# Altium PCB Lamps_motherboard.PcbDoc
Units mm, origin at the board's own origin, x right, y up, seen from the top; angles counter-clockwise.
Board outline 106 x 41 mm, 2 copper layers (Top Layer, Bottom Layer), stack 1.671 mm thick; 21 components, 30 nets, 130 pads, 12 vias.
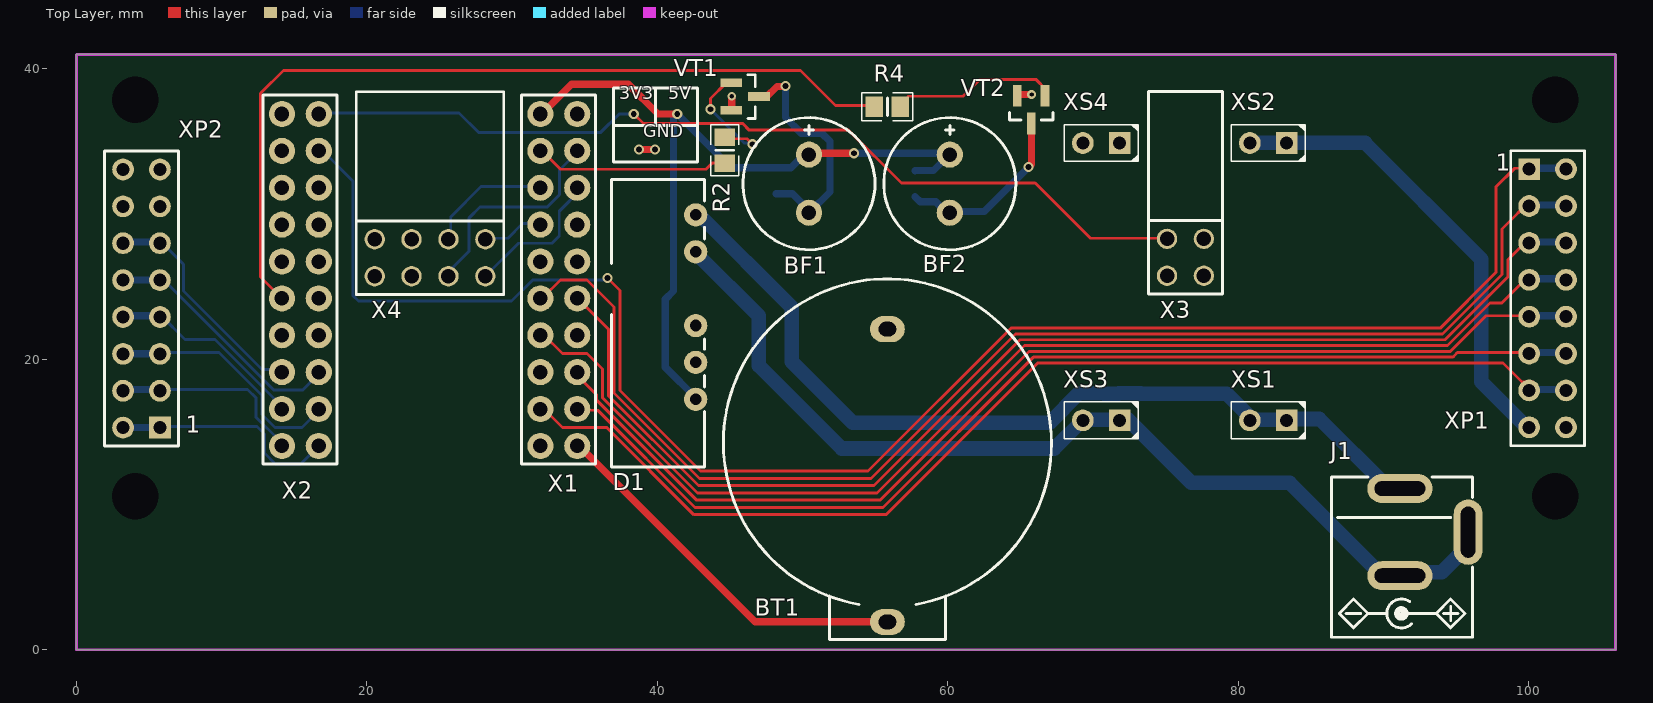
[diagram p0: Top Layer view]
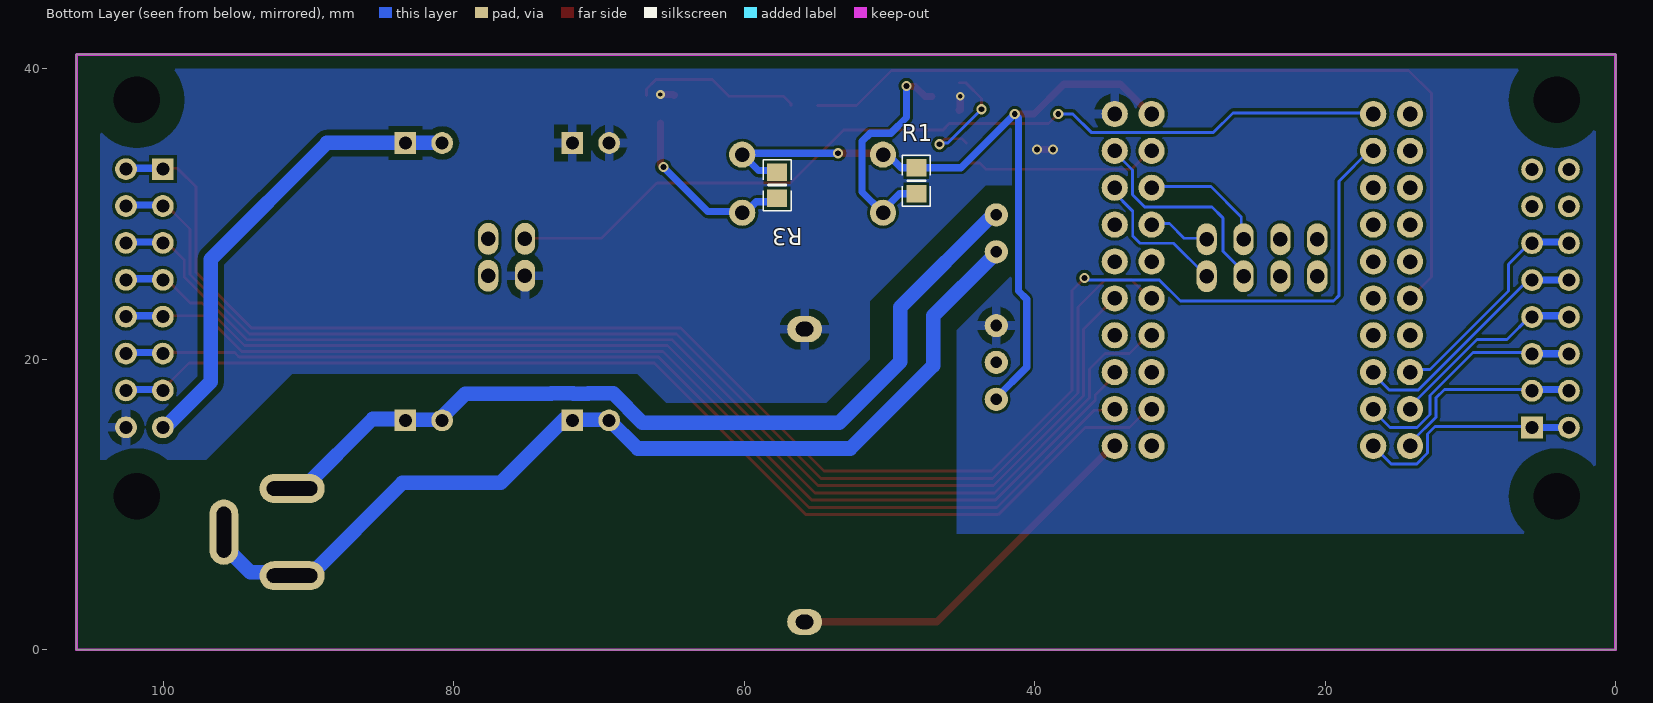
[diagram p1: Bottom Layer view, seen from below]
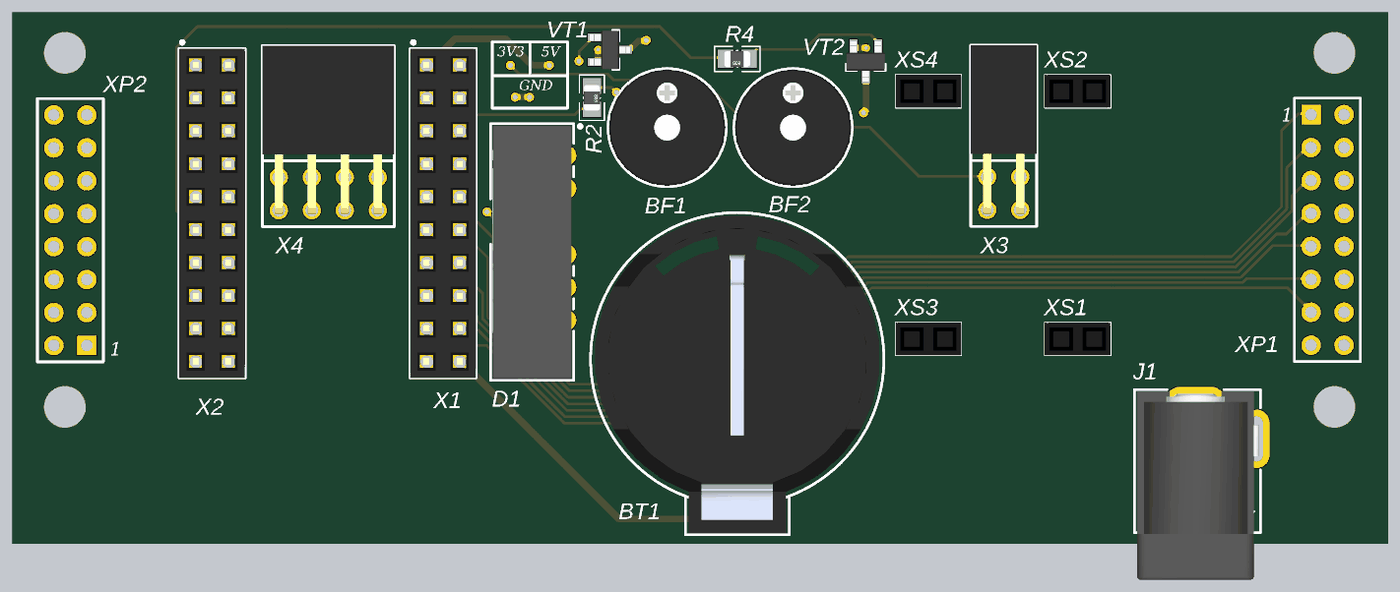
[diagram p2: 3D render of the assembled board from above, using the file's embedded part models]

## Layer stack, top to bottom
Top Solder: solder mask 0.0102, Solder Resist, Dk 3.5
Top Layer: signal copper 0.0356
Dielectric 1: dielectric 1.6, FR-4, Dk 4.8
Bottom Layer: signal copper 0.0356
Bottom Solder: solder mask 0.0102, Solder Resist, Dk 3.5

## Board outline
0,0 106,0 106,41 0,41

## Design rules (kind name [scope] priority, off if disabled: settings)
BoardOutlineClearance [All] p1: gap=0.2 ignorepadtopadclearanceinfootprint=FALSE
Clearance Holes [OnLayer('Keep-Out Layer')] p1: gap=0.5 ignorepadtopadclearanceinfootprint=FALSE
Clearance Pads [InPadClass('FreePads')] p2: gap=1.702 ignorepadtopadclearanceinfootprint=FALSE
Clearance Power [InNet('+V')] p3: gap=0.4 ignorepadtopadclearanceinfootprint=FALSE
Clearance [All] p4: gap=0.2 ignorepadtopadclearanceinfootprint=FALSE
ComponentClearance [All] p1: gap=0.127 collisioncheckmode=3 verticalgap=0.127 showdistances=TRUE
DiffPairsRouting [All] p1: maxlimit=0.254 minlimit=0.127 mostfreqgap=0.127 toplayer_minwidth=0.127 toplayer_maxwidth=25.4 toplayer_prefwidth=0.127 bottomlayer_minwidth=0.127 bottomlayer_maxwidth=25.4 bottomlayer_prefwidth=0.127 maxuncoupledlength=12.7
Height [All] p1: minheight=0 maxheight=1816.048 prefheight=12.7
HoleSize [All] p1: absolutevalues=TRUE maxlimit=6.3 minlimit=0.3 maxpercent=80.000 minpercent=20.000
HoleToHoleClearance [All] p1: gap=0.25 allowstackedmicrovias=FALSE
MinimumAnnularRing [All] p1: minimumring=0.076
MinimumSolderMaskSliver [All] p1: minsoldermaskwidth=0
PlaneClearance [All] p1: clearance=0.127
PlaneConnect PlaneConnectPowerPads [InPadClass('PowerPads')] p1: planeconnectstyle=Direct reliefexpansion=0.508 reliefentries=4 reliefconductorwidth=0.254 reliefairgap=0.254
PlaneConnect [All] p2: pad.planeconnectstyle=Relief pad.reliefexpansion=0.3 pad.reliefentries=4 pad.reliefconductorwidth=0.127 pad.reliefairgap=0.127 via.planeconnectstyle=Direct via.reliefexpansion=0.3 via.reliefentries=4 via.reliefconductorwidth=0.127 via.reliefairgap=0.127
PolygonConnect PolygonConnectPowerPads [All vs (InPadClass('PowerPads'))] p1: connectstyle=Direct reliefconductorwidth=0.254 reliefentries=4 polygonreliefangle="90 Angle" airgapwidth=0.254
PolygonConnect [All] p2: thpad.connectstyle=Relief thpad.reliefconductorwidth=0.635 thpad.reliefentries=4 thpad.polygonreliefangle="90 Angle" thpad.airgapwidth=0.508 smdpad.connectstyle=Relief smdpad.reliefconductorwidth=0.127 smdpad.reliefentries=4 smdpad.polygonreliefangle="90 Angle" smdpad.airgapwidth=0.127 via.connectstyle=Direct via.reliefconductorwidth=0.127 via.reliefentries=4 via.polygonreliefangle="90 Angle" via.airgapwidth=0.127
RoutingVias [All] p1: holewidth=0.3 width=0.6 viastyle="Through Hole" minholewidth=0.3 minwidth=0.6 maxholewidth=0.6 maxwidth=6.6
SilkToSilkClearance [All] p1: silktosilkclearance=0
SilkToSolderMaskClearance [IsPad] p1: minsilkscreentomaskgap=0.127 clearancetoexposedcopper=TRUE
SolderMaskExpansion [All] p1: expansion=0.075
Width [All] p1: maxlimit=25.4 minlimit=0.2 preferedwidth=0.5 minimp=50.000000 maximp=50.000000 favimp=50.000000
20 further rules are at their usual default settings.

## Classes and differential pairs
pad class FreePads: Free-5

## Components (designator, comment, footprint, x,y, rotation, side; value= is the part's Value field where it differs from the comment)
BF1 "DIP switch, 2.73 kHz, 3VDC, 80mA, -20...+70°C" "BUZ: AT-0927-TT-6-R" 50.45,32.1 r90 top
BF2 "DIP switch, 2.73 kHz, 3VDC, 80mA, -20...+70°C" "BUZ: AT-0927-TT-6-R" 60.15,32.1 r90 top
BT1 "VBAT" BTH2032 55.85,14.3 r90 top value=BAT3volt
D1 "DC/DC converter, isolator, 12V 167mA, -40...+105°C, SIP-7" "MOD: SIP-7 (B1212S-2W)" 42.65,23.6 r270 top
J1 "DC_POWER_JACK" JAC_PWR2MM 91.15,11.1 r180 top
R1 "1k" RESC2012(0805)N 48.15,32.3 r270 bottom
R2 "1k" RESC2012(0805)N 44.65,34.4 r270 top
R3 "1k" RESC2012(0805)N 57.75,32 r270 bottom
R4 "1k" RESC2012(0805)N 55.85,37.4 r180 top
VT1 "BC846" SOT23-3N 46.05,38.1 r0 top
VT2 "BC846" SOT23-3N 65.75,37.2 r270 top
X1 "Connector, 20pin, 2.54mm, 500VAC, 3A" "CON: PBD-20" 31.95,36.9 r270 top
X2 "Connector, 20pin, 2.54mm, 500VAC, 3A" "CON: PBD-20" 14.15,36.9 r270 top
X3 "Connector, 4pin, 2.54mm, 500VAC, 3A" HDRR_F_2X2 77.65,28.3 r180 top
X4 "Connector, 8pin, 2.54mm, 500VAC, 3A" HDRR_F_2X4 24.35,27 r180 top
XP1 "PBD-16" HDR2X8 100.05,33.1 r270 top
XP2 "PBD-16" HDR2X8 5.75,15.3 r90 top
XS1 "PBS-2" PBS-2-3D 83.35,15.8 r180 top
XS2 "PBS-2" PBS-2-3D 83.35,34.9 r180 top
XS3 "PBS-2" PBS-2-3D 71.85,15.8 r180 top
XS4 "PBS-2" PBS-2-3D 71.85,34.9 r180 top

## Footprints (in the part's own frame and the unit in brackets; to place one, negate y for a bottom-side part, rotate by r counter-clockwise, add the part's x,y. Pads: shape width x height; smd on the part's side, far side on the other; paste and mask are expansions set on the pad)
BTH2032 [mm] "CR2032 BATTERY HOLDER"
  oval 1.8x2.4 hole 1 slot 1.2 at 90 deg: 1(-12.38,0) 2(7.78,0)
  silkscreen extent -13.6,-11.3 11.25,11.3, body extent -13.45,-11 11.05,11, height 8.5
"BUZ: AT-0927-TT-6-R" [mm]
  round 1.8 hole 1: 1(2,0) 2(-2,0)
  silkscreen extent -4.55,-4.55 4.55,4.55, body extent -4.5,-4.5 4.5,4.5, height 4.52
"CON: PBD-20" [mm]
  round 1.8 hole 1: 1(0,0) 2(0,2.54) 3(2.54,0) 4(2.54,2.54) 5(5.08,0) 6(5.08,2.54) 7(7.62,0) 8(7.62,2.54) 9(10.16,0) 10(10.16,2.54) 11(12.7,0) 12(12.7,2.54) 13(15.24,0) 14(15.24,2.54) 15(17.78,0) 16(17.78,2.54) 17(20.32,0) 18(20.32,2.54) 19(22.86,0) 20(22.86,2.54)
  round 0.5 on Top Overlay: ""(-1.775,-1.05)
  round 0.5 on Mech1: ""(-0.6,-0.7)
  silkscreen extent -1.3,-1.3 24.1,3.8, body extent -1.3,-1.3 24.1,3.78, height 8.4
HDR2X8 [mm] "Connector; Header; 8x2 Position"
  rect 1.5x1.5 hole 0.9: 1(0,0)
  round 1.5 hole 0.9: 2(0,2.54) 3(2.54,0) 4(2.54,2.54) 5(5.08,0) 6(5.08,2.54) 7(7.62,0) 8(7.62,2.54) 9(10.16,0) 10(10.16,2.54) 11(12.7,0) 12(12.7,2.54) 13(15.24,0) 14(15.24,2.54) 15(17.78,0) 16(17.78,2.54)
  silkscreen extent -1.27,-1.27 19.05,3.81
HDRR_F_2X2 [mm] "Connector; Header; 2x2 Position"
  round 1.4 / inner round 1.4 / far side oval 1.4x2.2 hole 1: 1(0,0) 2(0,2.54) 3(2.54,0) 4(2.54,2.54)
  silkscreen extent -1.27,-10.16 3.81,3.81, body extent -1.27,-10.16 3.81,2.84, height 5
HDRR_F_2X4 [mm] "Connector; Header; 4x2 Position"
  round 1.4 / inner round 1.4 / far side oval 1.4x2.2 hole 1: 1(-3.81,-1.27) 2(-3.81,1.27) 3(-1.27,-1.27) 4(-1.27,1.27) 5(1.27,-1.27) 6(1.27,1.27) 7(3.81,-1.27) 8(3.81,1.27)
  silkscreen extent -5.08,-11.43 5.08,2.54, body extent -5.08,-11.43 5.08,1.57, height 5
JAC_PWR2MM [mm] "Power Jack KLDX-0202"
  oval 4.5x2 hole 1 slot 3.5 at 0 deg: 1(0,0) 2(0,6)
  oval 2x4.5 hole 1 slot 3.5 at 90 deg: 3(-4.7,3)
  silkscreen extent -5,-0.8 4.7,10.24, body extent -4.9,-0.65 4.5,13.85, height 10.8
"MOD: SIP-7 (B1212S-2W)" [mm]
  round 1.6 hole 0.8: 1(-6.35,0) 2(-3.81,0) 4(1.27,0) 5(3.81,0) 6(6.35,0)
  round 0.5 on Top Overlay: ""(-8.6,1.1)
  round 0.5 on Mech1: ""(-8.21,0)
  silkscreen extent -8.8,-5.8 11,0.6, body extent -8.66,-5.67 10.84,0.45, height 10.2
PBS-2-3D [mm] "Connector; Header; 2 Position"
  rect 1.5x1.5 hole 0.9: 1(0,0)
  round 1.5 hole 0.9: 2(2.54,0)
  silkscreen extent -1.27,-1.27 3.81,1.27, body extent -1.27,-1.27 3.81,1.27, height 8.5
RESC2012(0805)N [mm] "Chip Resistor, Body 2.0x1.3mm, IPC Medium Density"
  rect 1.2x1.4 smd: 1(-0.9,0) 2(0.9,0)
  silkscreen extent -1.75,-0.97 1.75,0.97, body extent -1,-0.61 1,0.64, height 0.78
SOT23-3N [mm] "SOT23, 3-Leads, Body 2.9x1.3mm, Pitch 0.95mm, Lead Span 2.5mm, IPC Medium Density"
  rect 1.5x0.6 smd: 1(-0.95,0.95) 2(-0.95,-0.95) 3(0.95,0)
  silkscreen extent 0.2,-1.5 0.7,1.5, body extent -1.57,-1.5 1.57,1.5, height 1

## Part data
BF1 BF2: library part Buzzer, CurrentMax=80mA, Frequency="2.73 kHz", Manufacturer="PUI Audio", PartNumber=AT-0927-TT-6-R, Temperature=-20...+70°C, VoltageMax=3VDC, HelpURL=https://www.digikey.com/products/en?keywords=AT-0927-TT-6-R, TypeBuzzer="DIP switch", ValueManufacturerPartNumber="DIP switch, 2.73 kHz, 3VDC, 80mA, -20...+70°C"
BT1: library part BATH_CR2032, "BATTERY HOLDER, CR2032", MANF_P#=-
D1: library part B1212S-2WR2, "DC/DC converter", Manufacturer=Mornsun, OutputVoltage="12V 167mA", Package=SIP-7, Temperature=-40...+105°C, ComponentType="DC/DC converter", HelpURL=https://www.compel.ru/infosheet/MORNSUN/B1212S-2WR2, OutputType=isolator, PartNumber=B1212S-2WR2, ValueManufacturerPartNumber="DC/DC converter, isolator, 12V 167mA, -40...+105°C, SIP-7"
J1: library part CONN_PWR_JACK2MM, "CONN, PWR JACK DC, PLUG DIAM 2.0MM RA THD", MANF="CUI STACK", MANF_P#="PJ-202A, PJ-002AH, PJ-102AH, KLDX-0202"
R1 R2 R3 R4: library part RESC2012(0805), Package=0805, Part Number=RESC2012(0805)
VT1 VT2: library part BC848, HelpURL=http://www.nxp.com/documents/data_sheet/BC848_SER.pdf, Part Number=BC848
X1 X2: library part PBD-20, CurrentMax=3A, Manufacturer=Connfly, VoltageMax=500VAC, CommentText="\"Ðàçúåì\"", HelpURL=https://www.chipdip.ru/product/pbd-20, Multichannel=20pin, PartNumber=PBD-20, Pitch=2.54mm, System=Connector, TypeConnector=Connector, ValueManufacturerPartNumber="Connector, 20pin, 2.54mm, 500VAC, 3A"
X3: library part PBD-4, CurrentMax=3A, Manufacturer=Connfly, VoltageMax=500VAC, CommentText="\"Ðàçúåì\"", HelpURL=https://www.chipdip.ru/product/pbd-4, Multichannel=4pin, PartNumber=PBD-4, Pitch=2.54mm, System=Connector, TypeConnector=Connector, ValueManufacturerPartNumber="Connector, 4pin, 2.54mm, 500VAC, 3A"
X4: library part PBD-8, CurrentMax=3A, Manufacturer=Connfly, VoltageMax=500VAC, CommentText="\"Ðàçúåì\"", HelpURL=https://www.chipdip.ru/product/pbd-8, Multichannel=8pin, PartNumber=PBD-8, Pitch=2.54mm, System=Connector, TypeConnector=Connector, ValueManufacturerPartNumber="Connector, 8pin, 2.54mm, 500VAC, 3A"
XP1 XP2: library part SH2-16G, "CONN RCPT 16POS 0.1 GOLD PCB", Digi-Key Part Number=ED3071-ND, Package="Socket 16POS 2.54mm", HelpURL=https://www.digikey.com/en/products/detail/on-shore-technology-inc/SH2-16G/2721215, Manufacturer Part Number=SH2-16G, Part Number=SH2-16G, Price$=0.20250, System=Connector
  XP1: System:Connector=True
XS1 XS2 XS3 XS4: Part Number=PBS-2

## Free pads (board coordinates)
  round 1.524 hole 3.2: 5(4.06,10.56) 5(4.06,37.865) 5(101.85,10.56) 5(101.85,37.865)

## Via types
v1: diameter 0.7, hole 0.4, Top Layer to Bottom Layer, 10 vias
v2: diameter 0.6, hole 0.3, Top Layer to Bottom Layer, 2 vias

## Nets (pads, with @x,y where several pads share a name; then routed paths per layer and width w, separated by ;. In a path a pad name is that pad's centre, name@x,y a point inside that pad or via, vN(x,y) a via of type N, cw(c..) or ccw(c..) an arc to the next point about the centre after c; other vN are vias at no path point)
3V3: X2.2 X3.3 | length 62.9
  Top Layer w0.2: v1(38.377,36.904) 39.045,36.236 45.887,36.236 46.337,35.787 53.179,35.787 56.816,32.15 66.029,32.15 69.839,28.34 X3.3@75.18,28.34
  Bottom Layer w0.2: X2.2@16.887,36.976 26.352,36.976 27.692,35.636 36.109,35.636 37.377,36.904 v1(38.377,36.904)
5V: BF1.1 BF2.1 D1.6 R1.1 R3.1 X1.1 | length 55.4
  Top Layer w0.5: X1.1@32.127,36.976 34.101,38.95 38.007,38.95 40.053,36.904 v1(41.377,36.904) ; BF1.1@50.542,34.182 50.552,34.192 53.536,34.192 v1(53.546,34.201)
  Bottom Layer w0.5: D1.6@42.668,17.342 40.56,19.45 40.56,24.149 41.119,24.708 41.119,36.646 v1(41.377,36.904) 45.079,33.202 48.18,33.202 49.211,33.202 50.19,34.182 BF1.1@50.542,34.182 ; v1(53.546,34.201) 53.555,34.192 60.184,34.192 60.194,34.182 59.027,33.015 57.772,33.015 R3.1@57.756,32.999
24GND: D1.2 J1.2 J1.3 XS3.1 XS3.2 | length 67.3
  Bottom Layer w1: D1.2@42.877,27.44 42.877,27.115 46.986,23.006 46.986,19.577 52.701,13.862 67.357,13.862 XS3.2@69.389,15.894 ; XS3.2@69.757,15.854 XS3.1@72.06,15.854 ; XS3.1@72.361,15.919 76.776,11.504 83.547,11.504 89.907,5.144 91.157,5.144 91.348,5.336 94.027,5.336 95.857,7.165 J1.3@95.857,8.144
24V: D1.1 J1.1 XS1.1 XS1.2 | length 60.2
  Bottom Layer w1: D1.1@42.877,29.98 49.277,23.58 49.277,19.826 53.463,15.64 67.029,15.64 69.043,17.654 70.753,17.654 70.763,17.644 71.791,17.644 71.801,17.654 73.293,17.654 73.303,17.644 79.237,17.644 XS1.2@81.027,15.854 ; XS1.2@81.078,15.854 XS1.1@83.668,15.854 ; XS1.1@83.359,15.894 85.609,15.894 90.359,11.144 J1.1@91.157,11.144
+V: XP1.15 XS2.1 XS2.2 | length 31.7
  Bottom Layer w1: XS2.2@81.077,34.904 88.746,34.904 96.75,26.9 96.75,18.45 XP1.15@99.75,15.45
BUZZER1: R2.2 X1.3 | length 13.4
  Top Layer w0.2: X1.3@32,34.436 33.34,33.096 43.36,33.096 43.8,33.536 R2.2@44.7,33.536
BUZZER2: R4.2 X2.11 | length 58.7
  Top Layer w0.2: X2.11 12.675,25.675 12.675,38.325 14.25,39.9 49.866,39.9 52.282,37.484 R4.2@54.976,37.484
CTRL_COM_HOUR_H: X2.20 XP2.1 XP2.2 | length 15.3
  Bottom Layer w0.2: XP2.1@6.346,15.386 12.429,15.386 12.95,14.865 12.95,13.543 13.693,12.8 15.45,12.8 16.577,13.927 X2.20@16.577,14.104
  Bottom Layer w0.5: XP2.2 XP2.1
CTRL_COM_HOUR_L: X2.19 XP2.3 XP2.4 | length 12.4
  Bottom Layer w0.2: XP2.3@6.346,17.926 11.789,17.926 12.377,17.338 12.377,16.004 13.977,14.404 X2.19@14.477,14.404
  Bottom Layer w0.5: XP2.4@3.806,17.926 XP2.3@5.838,17.926
CTRL_COM_MIN_H: X2.18 XP2.5 XP2.6 | length 16.5
  Bottom Layer w0.2: XP2.5@6.346,20.466 9.815,20.466 12.777,17.504 12.777,16.194 13.671,15.3 15.531,15.3 16.837,16.606 16.875,16.606 X2.18@16.877,16.604
  Bottom Layer w0.5: XP2.6 XP2.5
CTRL_COM_MIN_L: X2.17 XP2.7 XP2.8 | length 13.2
  Bottom Layer w0.2: XP2.7@5.838,23.006 7.47,21.374 9.541,21.374 14.257,16.658 14.345,16.658 X2.17@14.347,16.656
  Bottom Layer w0.5: XP2.8@3.806,23.006 XP2.7@5.838,23.006
CTRL_COM_SEC_H: X2.16 XP2.9 XP2.10 | length 17
  Bottom Layer w0.2: XP2.9@6.346,25.546 6.14,25.34 13.579,17.902 15.593,17.902 16.577,18.886 X2.16@16.577,19.104
  Bottom Layer w0.5: XP2.10 XP2.9
CTRL_COM_SEC_L: X2.15 XP2.11 XP2.12 | length 15.4
  Bottom Layer w0.2: XP2.11@5.838,28.086 7.377,26.547 7.377,24.704 12.775,19.306 13.779,19.306 X2.15@13.877,19.404 ; X2.15@13.608,19.502 13.61,19.504 X2.15@14.177,19.504
  Bottom Layer w0.5: XP2.12@3.806,28.086 XP2.11@5.838,28.086
CTRL_SEG_A: X2.4 XP1.1 XP1.2 | length 117
  Top Layer w0.2: v1@36.677,25.604 36.677,25.504 37.431,24.75 37.431,17.852 42.979,12.304 54.52,12.304 64.366,22.15 93.926,22.15 97.777,26.001 97.777,31.887 99.056,33.166 99.564,33.166 100.072,33.674 XP1.1@100.326,33.674
  Bottom Layer w0.2: X2.4@16.935,34.388 19.035,32.288 19.035,24.414 19.427,24.022 29.968,24.022 31.422,25.476 36.449,25.476 v1(36.577,25.604)
  Bottom Layer w0.5: XP1.1@100.388,33.166 XP1.2@102.612,33.166
CTRL_SEG_B: X1.11 XP1.3 XP1.4 | length 90.2
  Top Layer w0.2: X1.11@32.127,24.276 33.327,25.476 35.164,25.476 37.031,23.609 37.031,17.686 42.913,11.804 54.727,11.804 64.673,21.75 94.092,21.75 98.177,25.835 98.177,28.985 XP1.3@100.326,31.134
  Bottom Layer w0.5: XP1.3@100.326,30.626 XP1.4@102.866,30.626
CTRL_SEG_C: X1.12 XP1.5 XP1.6 | length 84.2
  Top Layer w0.2: X1.12@34.667,24.276 34.667,24.052 36.631,22.088 36.631,17.754 36.631,17.52 42.847,11.304 54.935,11.304 64.981,21.35 94.257,21.35 98.577,25.67 98.577,26.845 XP1.5@100.326,28.594
  Bottom Layer w0.5: XP1.5@100.326,28.086 XP1.6@102.866,28.086
CTRL_SEG_D: X1.13 XP1.7 XP1.8 | length 82.4
  Top Layer w0.2: X1.13@32.127,21.736 33.467,20.396 35.164,20.396 36.231,19.329 36.231,17.355 42.782,10.804 55.142,10.804 65.288,20.95 94.423,20.95 97.362,23.889 98.161,23.889 XP1.7@100.326,26.054
  Bottom Layer w0.5: XP1.7@100.326,25.546 XP1.8@102.485,25.546
CTRL_SEG_E: X1.16 XP1.9 XP1.10 | length 77.8
  Top Layer w0.2: X1.16 34.49,18.885 35.831,17.544 35.831,17.189 42.716,10.304 55.349,10.304 65.595,20.55 94.619,20.55 97.075,23.006 99.818,23.006 XP1.9@100.326,23.514
  Bottom Layer w0.5: XP1.9@100.326,23.006 XP1.10@102.866,23.006
CTRL_SEG_F: X1.18 XP1.11 XP1.12 | length 75.7
  Top Layer w0.2: X1.18@34.667,16.656 34.829,16.494 35.906,16.494 42.596,9.804 55.556,9.804 65.902,20.15 94.784,20.15 94.938,20.304 94.943,20.304 95.105,20.466 99.818,20.466 XP1.11@100.326,20.974
  Bottom Layer w0.5: XP1.11@100.326,20.466 XP1.12@102.866,20.466
CTRL_SEG_G: X1.17 XP1.13 XP1.14 | length 78.7
  Top Layer w0.2: X1.17@32.127,16.656 33.483,15.3 36.525,15.3 42.521,9.304 55.763,9.304 66.209,19.75 98.248,19.75 99.564,18.434 XP1.13@100.326,18.434
  Bottom Layer w0.5: XP1.13@100.326,17.926 XP1.14@102.866,17.926
GND: BT1.2 D1.4 VT1.2 VT2.2 X1.2 X3.4 XP1.16 XS4.1 XS4.2 | length 3.1
  Top Layer w0.5: v1(38.75,34.45) v1(39.85,34.45) ; v2(45.125,38.125) 45.125,37.2 45.175,37.15 VT1.2@45.2,37.15 ; VT2.2@64.832,38.18 64.832,38.196 64.882,38.246 v2(65.782,38.246)
NetBF1_2: BF1.2 R1.2 VT1.3 | length 16.2
  Top Layer w0.5: VT1.3@47.1,38.1 47.55,38.1 48.242,38.792 48.802,38.792 v1(48.84,38.83)
  Bottom Layer w0.5: R1.2@48.18,31.402 49.322,31.402 50.542,30.182 51.892,31.532 51.892,35.016 51.329,35.579 49.92,35.579 48.84,36.659 v1(48.84,38.83)
NetBF2_2: BF2.2 R3.2 VT2.3 | length 12.6
  Top Layer w0.5: v1(65.579,33.242) 65.782,33.445 VT2.3@65.782,36.28
  Bottom Layer w0.5: R3.2@57.756,31.199 58.106,30.849 59.175,30.849 59.842,30.182 62.519,30.182 v1(65.579,33.242)
NetR2_1: R2.1 VT1.1 | length 8.8
  Top Layer w0.2: v1(43.659,37.23) 43.659,37.959 44.75,39.05 VT1.1@45.2,39.05 ; R2.1@44.7,34.89 45.008,35.198 46.173,35.198 v1(46.554,34.817)
  Bottom Layer w0.2: v1(43.659,37.23) 45.976,34.913 46.459,34.913 v1(46.554,34.817)
NetR4_1: R4.1 VT2.1 | length 11.5
  Top Layer w0.2: R4.1@56.776,37.484 56.776,37.584 57.312,38.12 61.052,38.12 62.194,39.262 66.1,39.262 66.732,38.63 VT2.1@66.732,38.18
SWITCH_BACK: X1.7 X4.1 | length 4.2
  Bottom Layer w0.2: X4.1@28.317,28.34 29.713,28.34 30.729,29.356 X1.7@32.127,29.356
SWITCH_DOWN: X1.6 X4.2 | length 10
  Bottom Layer w0.2: X4.2@28.317,25.8 28.317,25.875 30.442,28 32.743,28 33.25,28.507 33.25,30.207 34.631,31.588 X1.6@34.631,31.788
SWITCH_ENTER: X1.4 X4.4 | length 15.3
  Bottom Layer w0.2: X4.4@25.777,25.8 25.777,26.2 27.047,27.47 27.047,29.75 27.797,30.5 32.428,30.5 33.27,31.342 33.27,33.039 34.631,34.4 X1.4@34.631,34.688
SWITCH_UP: X1.5 X4.3 | length 8.7
  Bottom Layer w0.2: X4.3@25.777,28.34 25.777,29.804 27.869,31.896 X1.5@32.127,31.896
VBAT: BT1.1 X1.20 | length 26.4
  Top Layer w0.5: X1.20@34.54,14.116 46.732,1.924 BT1.1@55.876,1.924
pads on no net: D1. D1.5 X1. X1.8 X1.9 X1.10 X1.14 X1.15 X1.19 X2. X2.1 X2.3 X2.5 X2.6 X2.7 X2.8 X2.9 X2.10 X2.12 X2.13 X2.14 X3.1 X3.2 X4.5 X4.6 X4.7 X4.8 XP2.13 XP2.14 XP2.15 XP2.16

## Polygon pours and split planes (outlines as drawn)
GND on Bottom Layer "Bottom Layer-GND" (solid, remove dead copper, pour order 4): 1.377,40.004 1.377,8.004 45.377,8.004 45.377,22.004 41.377,26.004 41.377,32.004 43.377,32.004 51.377,24.004 51.377,20.004 54.377,17.004 65.377,17.004 67.377,19.004 91.146,19.004 97.05,13.1 97.377,13.1 104.377,13.1 104.377,40.004

## Keep-outs
Keep-Out Layer:
  the board outline again, w0.2

## Silkscreen, mask and mechanical layers (free items; w line width, h text height)
Top Overlay:
  lines w0.2: 36.977,36.104 42.777,36.104 ; 39.877,36.18 39.877,38.604 ; 36.977,33.604 42.777,33.604 42.777,38.704 36.977,38.704 36.977,33.604
  text "3V3" at 37.377,37.604 h1.5
  text "5V" at 40.75,37.6 h1.5
  text "GND" at 39.05,35 h1.5

## Text inside footprints (layer, text, board x,y; h text height)
XP1: Top Overlay "1" at 97.764,32.592 h2
XP2: Top Overlay "1" at 7.528,14.538 h2